# Altium PCB ControlBoard_PCB.PcbDoc (part 2 of 2)
Units mm, origin at the board's own origin, x right, y up, seen from the top; angles counter-clockwise.
Board outline 41.4 x 42 mm, 2 copper layers (Top Layer, Bottom Layer), stack 1.448 mm thick; 86 components, 75 nets, 347 pads, 144 vias.
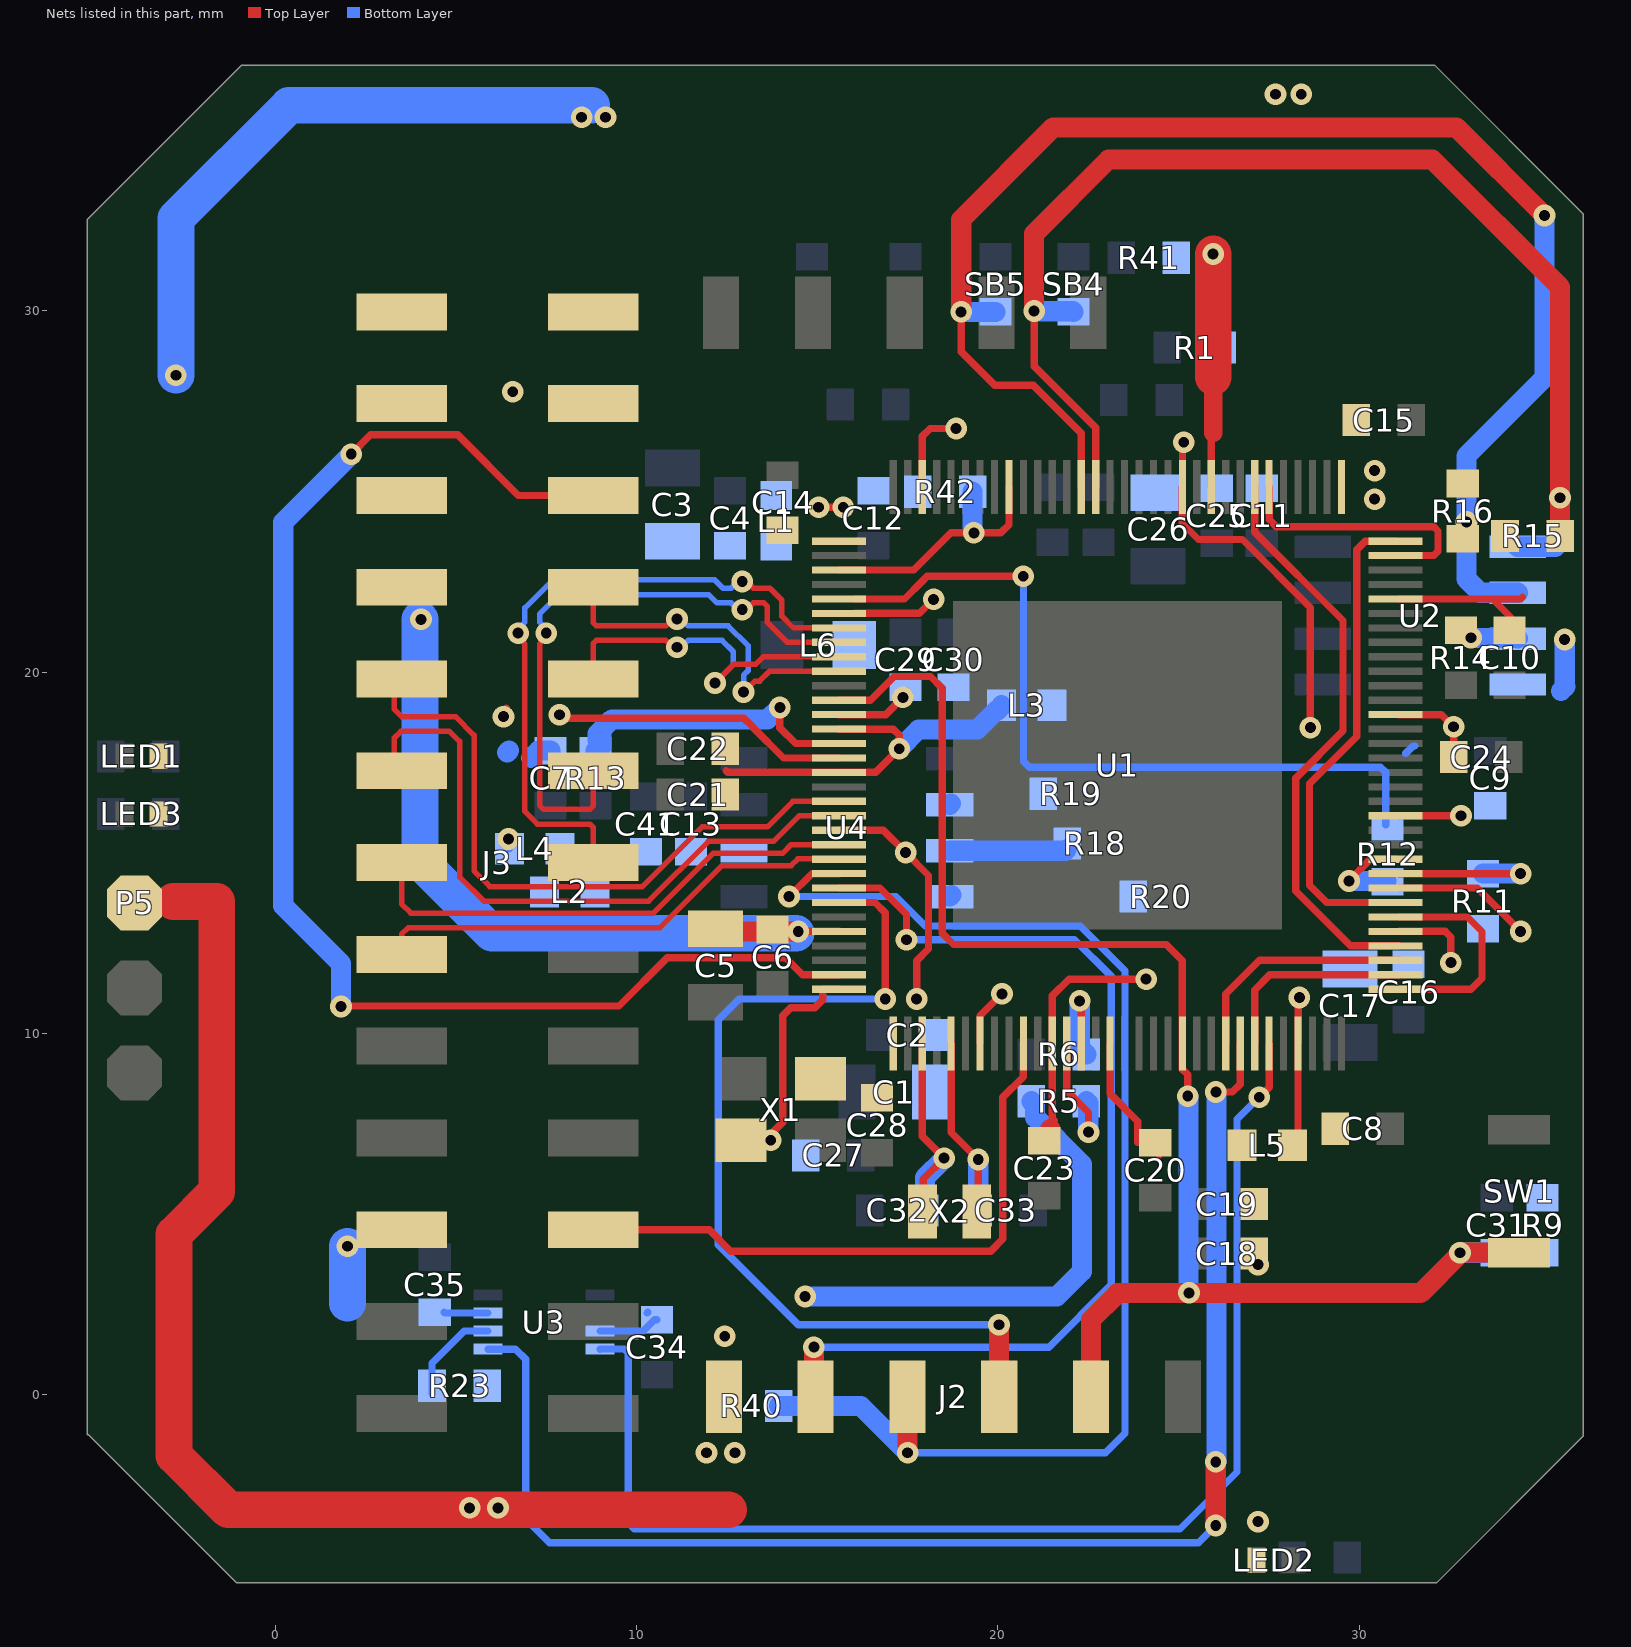
[diagram p2: the nets of this part, all layers, seen from the top]

## Via types
v1: diameter 0.6, hole 0.3, Top Layer to Bottom Layer, tented both sides, 138 vias
v2: diameter 3.2, hole 3.2, Top Layer to Bottom Layer, 4 vias
v3: diameter 0.6, hole 0.3, Top Layer to Bottom Layer, 2 vias

## Nets (pads, with @x,y where several pads share a name; then routed paths per layer and width w, separated by ;. In a path a pad name is that pad's centre, name@x,y a point inside that pad or via, vN(x,y) a via of type N, cw(c..) or ccw(c..) an arc to the next point about the centre after c; other vN are vias at no path point) (continued)
NetR5_2: R5.2 U1.13 | length 3.6
  Top Layer w0.203: U1.13@21.909,9.727 21.909,8.419 22.509,7.818 v1(22.509,7.274)
  Bottom Layer w0.559: R5.2@22.454,8.128 22.501,8.08 22.501,7.282 v1(22.509,7.274)
NetR6_2: R6.2 U1.14 | length 2.9
  Top Layer w0.203: v1@22.266,11.033 22.307,10.992 22.307,9.729 U1.14@22.309,9.727
  Bottom Layer w0.559: v1@22.268,10.904 v1(22.266,10.906) 22.266,9.611 R6.2@22.454,9.423
NetR11_2: R11.2 U1.40 | length 21.9
  Top Layer w0.203: U1.40@31.109,14.027 33.267,14.027 ; v1(34.468,12.827) 33.267,14.027 ; U1.40@31.459,14.027 33.267,14.027 ; U1.40@31.459,14.027 33.267,14.027 ; U1.40@31.459,14.027 33.267,14.027 ; U1.40@31.459,14.027 33.267,14.027 ; U1.40@31.459,14.027 33.267,14.027 ; U1.40@31.459,14.027 33.267,14.027 ; U1.40@31.459,14.027 33.267,14.027 ; U1.40@31.459,14.027 33.267,14.027 ; U1.40@31.459,14.027 33.267,14.027 ; U1.40@31.459,14.027 33.267,14.027
NetR12_2: R12.2 U1.42 | length 2.6
  Top Layer w0.203: v1(29.718,14.224) 29.718,14.238 30.307,14.827 U1.42@31.009,14.827
  Bottom Layer w0.203: R12.2@30.759,14.224 R12.2@30.785,14.199
  Bottom Layer w0.559: v1(29.718,14.224) R12.2@30.759,14.224
NetR13_2: R13.2 U1.111 | length 8.5
  Top Layer w0.203: v1(13.97,19.025) 13.97,18.466 14.408,18.027 U1.111@15.609,18.027
  Bottom Layer w0.559: R13.2@8.865,17.831 8.928,17.831 9.03,17.932 9.03,18.312 ; R13.2@8.928,18.11 8.928,18.301 9.322,18.694 13.629,18.694 13.959,19.025 v1(13.97,19.025)
NetR14_2: R14.2 U2.7 | length 1.3
  Bottom Layer w0.559: v1(33.096,20.955) 33.104,20.947 34.374,20.947 U2.7@34.392,20.93
NetR18_1: R18.1 U4.3 | length 3.2
  Bottom Layer w0.559: U4.3@18.669,15.062 21.869,15.062 R18.1@21.895,15.088
NetR19_1: R19.1 U4.2 | length 0
  Bottom Layer w0.559: U4.2@18.669,16.332 U4.2@18.701,16.364
NetR20_1: R20.1 U4.4 | length 0.1
  Bottom Layer w0.559: U4.4@18.669,13.792 U4.4@18.715,13.838
NetR23_2: R23.2 U3.6 | length 2.8
  Bottom Layer w0.203: R23.2@4.343,0.025 R23.2@4.343,0.254 4.343,0.877 5.235,1.769 U3.6@5.893,1.769
NetU1_39: U1.39 U1.64 | length 13.6
  Top Layer w0.203: U1.39@31.009,13.627 29.101,13.627 28.626,14.102 28.626,16.911 29.935,18.22 29.935,23.392 30.169,23.626 U1.64@31.009,23.627 U1.64@31.009,23.627
NetU1_63: U1.63 U1.70 | length 7.4
  Top Layer w0.203: U1.70@27.509,25.127 27.509,24.224 27.705,24.028 32.063,24.028 32.182,23.909 32.182,23.348 32.063,23.229 U1.63@31.11,23.229
OPTO_IN: J3.6 U1.127 | length 38.9
  Top Layer w0.203: v1(1.824,10.749) 1.84,10.765 9.52,10.765 10.858,12.102 14.125,12.102 14.598,11.629 15.607,11.629 U1.127@15.609,11.627 ; v1(2.108,26.035) 2.642,26.568 5.055,26.568 6.731,24.892 J3.6@8.805,24.892
  Bottom Layer w0.559: v1(1.824,10.749) 1.824,11.943 0.229,13.538 0.229,24.155 v1(2.108,26.035)
PHY_IRQn: R42.2 U1.88 U1.99 | length 7.4
  Top Layer w0.203: U1.99@15.609,22.827 17.678,22.827 18.707,23.856 v1(19.339,23.856) 20.086,23.856 20.309,24.079 U1.88@20.309,25.127
  Bottom Layer w0.559: R42.2@19.304,24.994 19.304,23.903 19.339,23.868 v1(19.339,23.856)
QSPI_CLK: R11.1 U1.41 | length 34.5
  Top Layer w0.203: U1.41@31.109,14.427 v1(34.468,14.427) ; U1.41@31.459,14.427 v1(34.468,14.427) ; U1.41@31.459,14.427 v1(34.468,14.427) ; U1.41@31.459,14.427 v1(34.468,14.427) ; U1.41@31.459,14.427 v1(34.468,14.427) ; U1.41@31.459,14.427 v1(34.468,14.427) ; U1.41@31.459,14.427 v1(34.468,14.427) ; U1.41@31.459,14.427 v1(34.468,14.427) ; U1.41@31.459,14.427 v1(34.468,14.427) ; U1.41@31.459,14.427 v1(34.468,14.427) ; U1.41@31.459,14.427 v1(34.468,14.427)
  Bottom Layer w0.559: R11.1@33.426,14.427 v1(34.468,14.427)
QSPI_CS: R12.1 U1.101 | length 23
  Top Layer w0.203: v1(20.704,22.654) 18.043,22.654 17.924,22.535 17.417,22.027 ; 17.417,22.027 16.059,22.027 17.417,22.027
  Bottom Layer w0.203: v1(20.704,22.654) 20.714,22.644 20.714,17.537 20.877,17.374 30.59,17.374 30.734,17.229 R12.1@30.734,15.773
QSPI_SIO0: U1.33 U1.38 | length 6.2
  Top Layer w0.203: U1.33@31.109,11.227 33.097,11.227 33.401,11.532 33.401,12.827 33.001,13.227 U1.38@31.109,13.227
QSPI_SIO1: U1.26 U1.34 | length 5.7
  Top Layer w0.203: U1.26@27.109,9.727 27.109,11.208 27.528,11.627 U1.34@31.009,11.627 U1.34@31.109,11.627
QSPI_SIO2: U1.24 U1.35 | length 6.6
  Top Layer w0.203: U1.24@26.309,9.727 26.309,11.094 27.242,12.027 U1.35@31.009,12.027 U1.35@31.109,12.027
QSPI_SIO3: U1.36 U1.71 | length 16.9
  Top Layer w0.203: U1.71@27.11,24.417 27.11,25.126 U1.71@27.109,25.127 27.109,23.874 29.554,21.429 29.554,18.378 28.245,17.069 28.245,13.945 29.762,12.427 U1.36@31.009,12.427 U1.36@31.109,12.427
RST: C31.1 J2.5 R9.1 SW1.1 U1.21 U1.108 | length 42
  Top Layer w0.203: U1.108@15.609,19.227 16.478,19.227 17.134,19.883 18.14,19.883 18.466,19.558 18.466,12.776 18.775,12.467 24.666,12.467 25.109,12.024 U1.21@25.109,9.727 25.109,9.018 25.257,8.87 v1(25.257,8.269)
  Top Layer w0.559: J2.5@22.581,-0.051 22.581,2.083 23.317,2.819 v1@25.289,2.819 ; v1(25.294,2.824) v1@25.289,2.819 ; v1@32.804,3.924 31.699,2.819 v1@25.289,2.819 ; v1@32.819,3.94 SW1.1@34.424,3.94
  Bottom Layer w0.559: v1(25.257,8.269) 25.278,8.248 25.278,2.84 v1(25.294,2.824) ; v1(32.791,3.937) C31.1@33.807,3.937
RXA_N: J3.14 U1.103 | length 18.8
  Top Layer w0.152: v1(6.728,21.082) 6.728,20.961 6.914,20.775 6.914,16.147 7.262,15.799 8.716,15.799 8.805,15.71 J3.14@8.805,14.732 ; v1(12.929,22.509) 13.05,22.509 13.235,22.324 13.695,22.324 14.022,21.996 14.022,21.554 14.349,21.227 U1.103@15.609,21.227
  Bottom Layer w0.152: v1(6.728,21.082) 6.728,21.203 6.914,21.389 6.914,21.779 7.69,22.555 12.168,22.555 12.4,22.324 12.622,22.324 12.807,22.509 v1(12.929,22.509)
RXA_P: J3.12 U1.104 | length 17.5
  Top Layer w0.152: v1(7.506,21.082) 7.506,20.961 7.32,20.775 7.32,16.315 7.43,16.205 8.716,16.205 8.805,16.294 J3.12@8.805,17.272 ; v1(12.929,21.731) 13.05,21.731 13.235,21.917 13.526,21.917 13.616,21.828 13.616,21.386 14.174,20.827 U1.104@15.609,20.827
  Bottom Layer w0.152: v1(7.506,21.082) 7.506,21.203 7.32,21.389 7.32,21.611 7.858,22.149 12,22.149 12.232,21.917 12.622,21.917 12.807,21.731 v1(12.929,21.731)
RXB_N: J3.15 U1.119 | length 13.6
  Top Layer w0.152: J3.15@3.505,12.192 3.505,12.751 3.683,12.928 7.274,12.928 ; 7.324,12.927 cw(c7.324,13.663) 7.274,12.928 ; U1.119@15.609,14.827 15.6,14.836 14.469,14.836 14.284,14.651 12.365,14.651 10.641,12.927 7.274,12.928
RXB_P: J3.13 U1.118 | length 14.1
  Top Layer w0.152: J3.13@3.505,14.732 3.505,13.589 3.761,13.333 10.473,13.333 12.126,14.986 14.044,14.986 14.285,15.227 U1.118@15.609,15.227
SCL_: R16.1 SB5.1 U1.83 U2.6 | length 41.1
  Top Layer w0.203: v1@18.987,29.947 18.987,28.867 19.914,27.94 20.98,27.94 22.31,26.61 U1.83@22.31,25.129
  Top Layer w0.559: v1@18.987,29.947 v1(18.987,29.972) 18.987,32.529 21.535,35.077 32.69,35.077 v1(35.128,32.639)
  Bottom Layer w0.559: v1(18.987,29.972) SB5.1@19.939,29.972 ; U2.6@34.392,22.2 33.353,22.2 32.969,22.583 v1(32.969,24.155) 32.969,25.984 35.128,28.143 v1(35.128,32.639)
SDA_: R15.1 SB4.1 U1.82 U2.5 | length 35
  Top Layer w0.203: v1(21.006,29.997) 21.006,28.467 22.709,26.764 U1.82@22.709,25.131
  Top Layer w0.559: v1(21.006,29.997) 21.006,32.131 23.063,34.188 32.025,34.188 35.56,30.654 v1(35.56,24.83) R15.1@35.56,23.774
  Bottom Layer w0.559: v1(21.006,29.997) 21.014,29.99 22.08,29.99 SB4.1@22.098,29.972 ; U2.5@34.392,23.47 35.433,23.47 35.56,23.597 v1(35.56,24.83)
STEP: J3.22 U1.10 | length 17.4
  Top Layer w0.203: J3.22@8.805,4.572 12.014,4.572 12.605,3.981 19.805,3.981 20.142,4.318 20.142,8.235 20.707,8.8 20.707,9.726 U1.10@20.709,9.727
SWDCLK: J2.3 R40.2 U1.120 | length 36.5
  Top Layer w0.203: v1(14.224,13.792) 14.859,14.427 U1.120@15.609,14.427
  Top Layer w0.559: J2.3@17.501,-0.051 17.505,-0.056 v1(17.505,-1.6)
  Bottom Layer w0.203: v1(14.224,13.792) 17.177,13.792 17.99,12.979 22.281,12.979 23.52,11.74 23.52,-1.06 22.98,-1.6 v1(17.505,-1.6)
  Bottom Layer w0.559: R40.2@13.945,-0.305 16.21,-0.305 v1(17.505,-1.6)
SWDIO: J2.2 U1.121 | length 27.8
  Top Layer w0.203: U1.121@15.609,14.027 16.741,14.027 17.475,13.293 v1(17.475,12.598)
  Top Layer w0.559: v1@14.918,1.324 14.918,-0.009 J2.2@14.961,-0.051
  Bottom Layer w0.203: v1(14.91,1.324) 21.417,1.324 23.139,3.047 23.139,11.582 22.123,12.598 v1(17.475,12.598)
SWO: J2.4 U1.122 | length 25.5
  Top Layer w0.203: U1.122@15.609,13.627 16.602,13.627 16.887,13.342 v1(16.887,10.955)
  Top Layer w0.559: v1@20.038,1.94 20.038,-0.048 J2.4@20.041,-0.051
  Bottom Layer w0.203: v1@16.837,10.955 12.846,10.955 12.268,10.377 12.268,4.153 14.479,1.943 v1(20.035,1.943)
TXA_N: J3.10 U1.105 | length 10
  Top Layer w0.152: J3.10@8.805,19.812 8.805,20.79 8.894,20.879 10.818,20.879 11.004,20.693 v1(11.125,20.693) ; v1(12.175,19.702) 12.688,20.215 13.297,20.215 13.513,20.431 15.606,20.431 U1.105@15.609,20.427
  Bottom Layer w0.152: v1(11.125,20.693) 11.246,20.693 11.432,20.879 12.37,20.879 12.683,20.566 12.683,20.21 v1(12.175,19.702)
TXA_P: J3.8 U1.106 | length 9.9
  Top Layer w0.152: J3.8@8.805,22.352 8.805,21.374 8.894,21.285 10.818,21.285 11.004,21.471 v1(11.125,21.471) ; v1(12.965,19.452) 12.977,19.452 13.278,19.753 13.41,19.753 13.684,20.027 U1.106@15.609,20.027
  Bottom Layer w0.152: v1(11.125,21.471) 11.246,21.471 11.432,21.285 12.538,21.285 13.089,20.734 13.089,20.041 12.965,19.918 v1(12.965,19.452)
TXB_N: J3.11 U1.116 | length 18.5
  Top Layer w0.152: J3.11@3.505,17.272 3.302,17.475 3.302,18.186 3.48,18.364 4.826,18.364 5.105,18.085 5.105,14.335 5.777,13.663 10.336,13.663 11.989,15.316 13.792,15.316 14.503,16.027 U1.116@15.609,16.027
TXB_P: J3.9 U1.115 | length 18.5
  Top Layer w0.152: J3.9@3.505,19.812 3.302,19.609 3.302,18.974 3.505,18.771 4.994,18.771 5.512,18.253 5.512,14.503 5.946,14.07 10.167,14.07 11.82,15.723 13.624,15.723 14.329,16.427 U1.115@15.609,16.427 U1.115@15.585,16.404
UART_RX: U1.27 U3.4 | length 35.3
  Top Layer w0.203: v1(27.234,8.24) 27.509,8.516 U1.27@27.509,9.727
  Bottom Layer w0.203: U3.4@8.993,1.269 U3.4@8.993,1.269 9.66,1.27 9.779,1.151 9.779,-3.545 9.943,-3.708 25.044,-3.708 26.619,-2.134 26.619,7.632 27.227,8.24 v1(27.234,8.24)
UART_TX: U1.25 U3.5 | length 39
  Top Layer w0.203: v1(26.035,8.382) 26.492,8.382 26.709,8.599 U1.25@26.709,9.727
  Top Layer w0.559: v1(26.032,-3.612) v1(26.032,-1.851)
  Bottom Layer w0.203: U3.5@5.893,1.269 6.656,1.269 6.934,0.991 6.934,-3.429 7.595,-4.089 25.555,-4.089 v1(26.032,-3.612)
  Bottom Layer w0.559: v1(26.032,-1.851) 26.051,-1.832 26.051,8.366 v1(26.035,8.382)
VCC_3V3: C1.1 C2.1 C8.1 C9.1 C10.1 C11.1 C12.1 C13.1 C14.1 C15.1 C16.1 C17.1 C18.1 C34.1 C41.1 J2.1 J3.2 J3.4 L1.1 L2.1 L4.1 L5.1 LED1.1 LED2.1 LED3.1 P5.1 R1.1 R5.1 R9.2 R15.2 R16.2 R23.1 R40.1 R41.2 R42.1 U1.7 U1.29 U1.37 U1.45 U1.60 U1.65 U1.74 U1.94 U1.97 U1.117 U2.8 U3.3 U4.6 | length 96.7
  Top Layer w0.203: v1(15.042,24.567) v1(15.723,24.567) v1@15.723,24.663 ; U1.117@15.609,15.627 16.834,15.627 v1(17.45,15.011) 18.085,14.376 18.085,12.344 17.755,12.014 v1(17.755,10.955) ; U1.94@17.909,25.127 17.909,26.526 18.129,26.746 v1(18.847,26.746) ; U1.7@19.509,9.727 19.509,10.492 v1(20.117,11.1) ; U1.74@25.909,25.127 25.909,26.569 25.959,26.619 ; v1@27.102,-3.581 v1@27.102,-3.531 ; L5.1@28.157,6.909 28.309,7.06 U1.29@28.309,9.727 28.31,9.729 28.31,10.962 v1(28.346,10.998) v1@28.359,10.986 ; U1.37@31.109,12.827 32.385,12.827 32.537,12.675 v1(32.537,11.963) ; U1.45@31.109,16.027 v1(32.817,16.027) ; U1.60@31.109,22.027 34.473,22.027 34.519,22.073 ; 33.744,21.971 C10.1@34.188,21.526
  Top Layer w0.508: 25.959,26.619 25.959,28.169
  Top Layer w1.016: -2.819,13.652 -1.613,13.652 -1.613,5.626 -2.794,4.445 -2.794,-1.676 -1.295,-3.175 6.172,-3.175 12.548,-3.175 ; 25.959,28.169 v1(25.959,31.572)
  Bottom Layer w0.203: U3.3@8.993,1.769 10.189,1.769 10.503,2.083 C34.1@10.566,2.083 ; C34.1@10.296,2.269 C34.1@10.312,2.285
  Bottom Layer w0.559: R40.1@12.408,-0.47 R40.1@12.446,-0.508 ; v1(14.669,2.725) 21.634,2.725 22.33,3.421 22.33,6.382 21.031,7.681 21.031,8.026 R5.1@20.93,8.128 ; 35.585,19.482 35.712,19.609 ; 35.687,19.609 v1(35.687,20.904)
  Bottom Layer w1.016: v1(-2.743,28.219) -2.743,32.563 0.381,35.687 8.763,35.687
  other v1: 27.203,-3.505 5.385,-3.124 6.172,-3.124 11.938,-1.6 12.725,-1.6 12.446,1.626 27.203,3.607 30.429,24.79 30.429,25.578 8.484,35.357 9.144,35.357 27.686,35.992 28.397,35.992
VDD12: C21.1 C22.1 L3.2 U1.110 U1.113 | length 10.5
  Top Layer w0.203: 12.484,17.272 12.529,17.227 U1.113@15.609,17.227 15.61,17.229 16.619,17.229 v1(17.272,17.882) 17.272,18.263 17.109,18.426 15.61,18.426 U1.110@15.609,18.427
  Bottom Layer w0.559: v1(17.272,17.882) 17.805,18.415 19.431,18.415 19.95,18.934 19.982,18.934 20.103,19.055 L3.2@20.103,19.087
VDD_5V: C35.1 J3.21 U3.7 | length 2.8
  Bottom Layer w0.203: C35.1@4.674,2.285 4.69,2.269 U3.7@5.893,2.269
  Bottom Layer w1.016: 2.007,2.54 v1(2.007,4.115)
VDD_CORE: C29.1 C30.1 L6.2 U1.109 | length 2
  Top Layer w0.203: U1.109@15.609,18.827 16.897,18.827 v1(17.374,19.304)
VDD_CR: C23.1 C24.1 C25.1 C26.1 L3.1 U1.12 U1.52 U1.76 | length 19.6
  Top Layer w0.203: 21.56,7.595 21.509,7.645 U1.12@21.509,9.727 21.509,11.044 21.971,11.506 v1(24.105,11.506) ; v1@25.159,26.352 v1(25.146,26.365) 25.11,26.33 25.11,25.129 U1.76@25.109,25.127 25.109,24.116 25.552,23.673 26.772,23.673 28.651,21.793 v1(28.651,18.466) ; U1.52@31.109,18.827 32.277,18.827 v1(32.614,18.491) C24.1@32.614,17.653
  Top Layer w0.559: C23.1@21.285,7.036 21.349,7.036 21.45,7.137 C23.1@21.45,7.356
  Bottom Layer w0.203: 31.293,17.755 31.496,17.958 31.547,17.958
VDDANA: C19.1 C20.1 L5.2 U1.16 | length 3.8
  Top Layer w0.203: U1.16@23.109,9.727 23.109,8.336 23.876,7.569 23.876,6.985 ; C20.1@24.224,7.222 24.46,6.985 C20.1@24.46,6.629
VDDBIAS: C7.1 L4.2 U1.112 | length 9.3
  Top Layer w0.203: v1(6.325,18.771) 6.325,18.928 v1@6.396,18.999 ; v1@6.477,15.271 v1@6.488,15.26 ; v1(7.874,18.821) 7.971,18.725 12.975,18.725 13.056,18.644 13.07,18.644 13.233,18.48 13.233,18.466 14.072,17.627 U1.112@15.609,17.627
  Bottom Layer w0.203: L4.2@6.488,15.113 L4.2@6.488,15.26
  Bottom Layer w0.559: 6.426,17.78 6.477,17.831 ; 7.087,17.628 7.29,17.831 C7.1@7.62,17.831
  other v1: 6.463,15.387
VDDTXRX1: C3.1 C4.1 J3.1 J3.3 L1.2 U1.102 | length 2.3
  Top Layer w0.203: U1.102@16.059,21.627 17.836,21.627 v1(18.226,22.017)
  other v1: 6.579,27.762
VDDTXRX2: C5.1 C6.1 J3.5 J3.7 L2.2 U1.124 | length 21.5
  Top Layer w0.203: v1(14.478,12.827) U1.124@15.609,12.827
  Top Layer w0.559: C5.1@12.04,12.903 12.115,12.827 v1(14.478,12.827)
  Bottom Layer w1.016: v1@4.013,21.463 4.013,14.768 6.005,12.776 v1@14.427,12.776
  other v1: 4.039,21.463
XIN32: C32.2 U1.3 X2.1 | length 6.8
  Top Layer w0.203: U1.3@17.909,9.727 17.909,7.162 v1(18.517,6.554) 17.94,5.977 17.94,5.101 X2.1@17.919,5.08
  Bottom Layer w0.559: C32.2@17.983,5.105 17.983,6.01 18.517,6.543 v1(18.517,6.554)
XOUT32: C33.2 U1.5 X2.2 | length 6.3
  Top Layer w0.203: U1.5@18.709,9.727 18.709,7.264 v1(19.459,6.514) X2.2@19.459,5.08
  Bottom Layer w0.559: C33.2@19.456,5.131 19.458,5.132 19.458,6.513 v1(19.459,6.514)
XTAL_IN: C27.2 U1.128 X1.1 | length 6.4
  Top Layer w0.203: X1.1@12.895,7.049 v1(13.716,7.049) 13.716,7.214 14.046,7.544 14.046,10.49 14.275,10.719 14.935,10.719 15.156,10.94 15.156,11.226 15.158,11.227 U1.128@15.609,11.227
XTAL_OUT: C28.2 U1.1 X1.3
pads on no net: U1.8 U1.9 U1.18 U1.19 U1.20 U1.22 U1.23 U1.28 U1.30 U1.31 U1.32 U1.48 U1.49 U1.50 U1.51 U1.53 U1.54 U1.55 U1.56 U1.57 U1.58 U1.59 U1.61 U1.62 U1.66 U1.67 U1.69 U1.72 U1.73 U1.75 U1.77 U1.78 U1.79 U1.80 U1.84 U1.85 U1.86 U1.87 U1.91 U1.92 U1.93 U1.96 U1.100 U1.107 U1.123 U1.125 U1.126 U4.1 U4.5 U4.8

## Polygon pours and split planes (outlines as drawn)
GND on Top Layer "Polygon_1" (hatched 45Degree grid 0.635 track 0.381, remove dead copper, pour order 2): -0.851,34.15 -0.942,34.364 32.134,34.364 33.782,32.715 33.782,-1.143 32.156,-2.769 -1.092,-2.769 -2.807,-1.054 -2.807,32.563 -2.743,32.563 -0.942,34.364
GND on Bottom Layer "Polygon_2" (hatched 45Degree grid 0.635 track 0.381, remove dead copper, pour order 1): -0.851,34.15 -0.942,34.364 32.134,34.364 33.782,32.715 33.782,-1.143 32.156,-2.769 -1.092,-2.769 -2.807,-1.054 -2.807,32.563 -2.743,32.563 -0.942,34.364

## Other copper
Top Layer:
  rectangle net VDDBIAS: 6.045,15.037 6.655,19.482
  rectangle net NetP1_1: -4.648,10.262 -2.807,12.09
  rectangle net VCC_3V3: 11.501,2.1 15.164,3.1
  rectangle net VCC_3V3: -3.48,16.688 -2.083,32.639
  rectangle net GND: -1.651,30.937 7.188,32.639
  rectangle net GND: -1.651,20.828 1.626,32.004
  rectangle net VDDTXRX1: 2.261,26.848 7.163,30.556
  rectangle net #UART_RX: 6.57,-2.21 10.888,0.711
  rectangle net #UART_TX: 6.57,0.94 10.888,3.15
  rectangle net VDD_5V: 1.27,3.48 5.588,5.791
  rectangle net DIAG: 1.27,6.02 5.588,8.331
  rectangle net LINK1: 1.27,8.56 5.588,10.211
  rectangle net XTAL_IN: 14.757,10.617 16.358,11.303
  rectangle net VDDTXRX2: 2.21,20.93 5.029,25.4
  rectangle net VCC_3V3: 7.417,26.873 11.252,35.738
  rectangle net GND: 14.402,6.325 17.12,7.645
  rectangle net VCC_3V3: -3.48,13.132 -1.118,18.136
  rectangle net VCC_3V3: -5.055,12.624 -1.118,14.681
  rectangle net GND: -1.6,-1.778 5.588,3.251
  rectangle net VCC_3V3: 34.188,20.498 35.992,22.758
  rectangle net NetR14_2: 32.334,20.549 33.376,21.59
  rectangle net GND: 32.258,19.152 35.89,20.066
  rectangle net VCC_3V3: 33.604,21.869 34.773,25.019
  rectangle net GND: 33.706,16.053 35.89,19.888
  rectangle net GND: 35.001,7.137 35.865,17.069
  rectangle net VDD12: 12.014,16.18 12.954,18.364
  rectangle net VCC_3V3: 32.41,24.638 34.773,28.169
  rectangle net VCC_3V3: 29.896,27.813 34.773,29.007
  rectangle net GND: 33.706,16.053 34.849,19.304
  rectangle net GND: 13.437,10.947 14.021,11.811
  rectangle net XTAL_IN: 12.192,6.401 14.148,7.645
  rectangle net GND: 12.141,8.077 13.691,9.093
  rectangle net GND: 10.973,8.052 13.767,11.811
  rectangle net VCC_3V3: 11.506,-3.683 13.132,2.642
  rectangle net NetLED1_2: -5.055,17.043 -3.81,18.898
  rectangle net NetLED3_2: -5.055,14.859 -3.81,16.713
  rectangle net VCC_3V3: 26.67,-5.029 27.559,-3.15
  rectangle net GND: 31.064,24.308 32.233,27.559
  rectangle net GND: 12.802,25.044 13.995,28.042
  rectangle net GND: 11.659,27.838 13.995,31.496
  rectangle net GND: 12.802,25.044 16.764,28.6
  rectangle net VCC_3V3: 10.414,23.52 12.573,27.432
  rectangle net GND: 23.647,-1.372 32.893,2.286
  rectangle net GND: 10.49,16.129 11.532,18.339
  rectangle net GND: 30.429,4.978 35.865,7.823
  rectangle net VDDANA: 26.416,4.724 27.534,6.553
  rectangle net VCC_3V3: 27.711,3.277 30.023,7.823
  rectangle net VDD_CR: 20.803,6.528 21.844,7.747
  rectangle net VCC_3V3: 11.125,23.52 16.358,24.867
  rectangle net VCC_3V3: 29.439,24.308 30.886,29.007
  rectangle net VCC_3V3: 33.604,20.498 34.773,22.555
  rectangle net SCL_: 32.461,23.038 33.376,24.435
  rectangle net GND: 20.828,3.302 26.01,6.02
  rectangle net VCC_3V3: 26.238,3.277 28.092,4.445
  rectangle net VDDANA: 23.774,6.325 27.534,7.671
  rectangle net XTAL_OUT: 14.402,7.849 17.196,10.439
Bottom Layer:
  rectangle net VDDTXRX1: 15.062,22.073 15.773,23.927
  rectangle net VDD_CORE: 15.418,18.898 19.202,20.371
  rectangle net GND: 20.93,23.216 23.19,24.054
  rectangle net NetR2_2: 22.708,26.975 23.8,28.169
  rectangle net VDDTXRX1: 15.062,21.692 18.542,22.377
  rectangle net NetR6_2: 21.692,8.89 22.835,10.047
  rectangle net GND: -3.581,15.748 -2.565,16.561
  rectangle net NetR13_2: 8.357,17.348 9.5,19.025
  rectangle net VDDBIAS: 6.045,17.348 8.153,19.329
  rectangle net GND: 6.299,30.48 13.31,31.75
  rectangle net VDDTXRX1: 7.772,22.987 15.773,23.927
  rectangle net GND: 29.713,-2.057 33.172,2.083
  rectangle net RST: 32.461,3.251 35.662,4.369
  rectangle net GND: 29.362,27.813 32.741,33.604
  rectangle net NetR19_1: 17.983,16.256 21.666,17.094
  rectangle net VDD_CR: 20.993,18.11 26.899,20.117
  rectangle net VDDTXRX2: 6.502,12.751 7.849,14.351
  rectangle net GND: 4.826,15.9 13.792,17.094
  rectangle net LINK0: 16.789,26.162 17.78,27.864
  rectangle net VCC_3V3: 17.374,7.518 18.186,11.227
  rectangle net GND: 31.496,18.999 33.223,20.32
  rectangle net VCC_3V3: 8.077,34.874 29.083,36.474
  rectangle net GND: 16.967,20.574 20.345,21.488
  rectangle net VDD_CORE: 15.416,19.66 16.713,21.438
  rectangle net NetL6_1: 13.405,20.066 15.189,21.463
  rectangle net VCC_3V3: 5.004,-5.055 27.305,-4.394
  rectangle net VDD_CR: 23.8,10.211 27.33,12.878
  rectangle net VDD_CR: 23.8,12.497 32.131,13.145
  rectangle net VDD_CR: 31.429,12.788 32.131,17.704
  rectangle net NetR20_1: 18.009,13.437 24.13,14.148
  rectangle net VCC_3V3: 27.711,31.572 29.083,36.271
  rectangle net VCC_3V3: 18.212,26.035 20.345,27.711
  rectangle net VDD_CR: 20.993,17.653 32.995,18.821
  rectangle net GND: 33.172,16.993 34.798,18.212
  rectangle net VCC_3V3: 32.36,15.189 35.382,16.815
  rectangle net NetR19_1: 17.983,15.977 21.666,16.713
  rectangle net NetR18_1: 17.983,14.707 22.327,15.723
  rectangle net GND: 21.184,20.879 32.487,24.054
  rectangle net VCC_3V3: 8.433,13.462 11.913,15.291
  rectangle net GND: 12.725,8.026 15.926,10.439
  rectangle net GND: 16.993,3.302 20.955,4.47
  rectangle net GND: 15.57,3.302 17.196,10.439
  rectangle net GND: 20.523,3.302 21.565,6.071
  rectangle net GND: 28.473,-1.372 32.156,9.677
  rectangle net VCC_3V3: 17.983,25.349 18.72,27.711
  rectangle net VCC_3V3: 19.126,9.779 20.371,11.379
  rectangle net XTAL_IN: 13.31,6.147 15.164,7.595
  rectangle net VCC_3V3: 5.004,-5.004 6.553,0.838
  rectangle net VCC_3V3: 11.506,-1.93 13.056,1.956
  rectangle net GND: 10.82,-3.429 24.867,-2.134
  rectangle net GND: 10.058,-3.429 11.201,1.168
  rectangle net GND: 7.391,3.353 10.693,3.835
  rectangle net GND: 3.581,3.378 10.693,5.944
  rectangle net VDD_5V: 1.499,1.88 4.867,3.2
  rectangle net LINK0: 13.487,28.854 15.386,30.353
  rectangle net NetLED3_2: -5.055,14.776 -3.835,16.706
  rectangle net NetLED1_2: -5.055,17.043 -3.835,18.974
  rectangle net VCC_3V3: 27.534,10.211 28.753,11.633
  rectangle net VCC_3V3: 34.493,4.674 35.382,12.167
  rectangle net VCC_3V3: 27.534,11.252 35.687,12.319
  rectangle net VCC_3V3: 35.052,4.674 35.992,19.152
  rectangle net VCC_3V3: 26.899,-5.055 27.559,4.42
  rectangle net GND: 31.064,22.454 32.487,33.604
  rectangle net GND: 15.189,26.899 16.332,28.499
  rectangle net VDDTXRX1: 6.248,22.987 9.474,28.194
  rectangle net GND: 9.881,24.638 13.106,29.388
  rectangle net VCC_3V3: 19.634,7.544 21.309,8.687
  rectangle net VCC_3V3: 17.602,7.544 20.371,10.744
  rectangle net VCC_3V3: 7.137,14.58 17.78,15.494
  rectangle net GND: 27.94,18.999 32.487,21.717
  rectangle net VCC_3V3: 33.528,18.821 35.992,19.964
  rectangle net GND: 28.956,4.674 34.315,11.074
  rectangle net VCC_3V3: 10.058,1.473 13.056,2.7
  rectangle net GND: 9.728,16.916 12.09,18.136
  rectangle net LINK1: 17.399,28.118 20.396,29.312
  rectangle net LINK1: 16.866,28.118 18.009,30.353
  rectangle net VCC_3V3: 26.873,24.359 29.083,29.896
  rectangle net VCC_3V3: 24.384,30.988 28.829,32.893
  rectangle net VCC_3V3: 25.654,28.473 29.083,32.817
  region net NetR1_2: 25.476,27.051 25.476,29.591 24.13,29.591 24.13,27.051
  rectangle net VDD_CR: 23.622,24.359 26.543,26.645
  rectangle net VCC_3V3: 26.873,24.359 30.886,25.984
  rectangle net NetR2_2: 22.25,24.359 23.419,28.169
  rectangle net NetJ1_1: 21.514,30.937 23.978,32.893
  rectangle net NetJ1_2: 19.355,31.115 20.498,32.893
  rectangle net NetJ1_3: 16.866,31.115 18.009,32.893
  rectangle net NetJ1_4: 14.275,31.115 15.418,32.893
  rectangle net VCC_3V3: 13.31,24.257 18.72,25.883
  rectangle net NetR11_2: 32.969,12.497 34.849,13.462

## Silkscreen, mask and mechanical layers (free items; w line width, h text height)
Top Overlay:
  lines w0.127: 28.804,6.579 30.607,6.579 31.013,6.172 ; 29.614,6.579 29.693,6.579
  text "JTAG" at 23.876,34.874 h1.4
  text "INTERFACING HEADER" at 1.727,31.369 h1.4
  text "#" at 14.427,27.178 h1.52 r180
  text "#" at 28.448,26.518 h1.52
  text "# >> 0.1uF" at -3.505,23.266 h2.03 r90
  text "#" at 35.687,20.269 h1.52 r180
  text "#" at 12.852,19.66 h1.52 r180
  text "#" at 34.9,17.12 h1.52
  text "#" at 12.852,15.824 h1.52 r180
  text "VCC_3V3" at -2.896,12.776 h1.27
  text "NetP1_1" at -2.896,10.427 h1.27
  text "#" at 13.31,9.652 h1.52
  text "GND" at -2.896,8.077 h1.27
  text "#" at 32.309,7.874 h1.52 r180
  text "#" at 20.93,3.81 h1.52
  text "#" at 24.003,3.759 h1.52
  text "SW HEADER" at -0.254,-4.851 h1.4
Bottom Overlay:
  text "#" at 12.192,26.772 h1.52 r180
  text "#" at 25.959,22.835 h1.52 r180
  text "#" at 27,22.835 h1.52 r180
  text "#" at 16.205,22.784 h1.52 r180
  text "#" at 20.295,20.295 h1.52
  text "#" at 11.151,18.339 h1.52 r180
  text "#" at 6.833,15.926 h1.52
  text "#" at 35.179,15.926 h1.52
  text "#" at 10.49,13.335 h1.52
  text "#" at 15.265,10.516 h1.52 r180
  text "#" at 31.699,8.611 h1.52
  text "#" at 33.452,3.226 h1.52 r180
  text "#" at 12.04,2.464 h1.52 r180
  text "# >> 0.1uF" at 15.621,-4.826 h2.03
Mechanical 2:
  lines w0.254: -5.2,-1.062 -5.2,32.519 ; -5.2,-1.062 -5.161,-1.101 -1.062,-5.2 ; -5.2,-1.062 -5.2,32.519 ; -5.2,32.519 -0.919,36.8 ; -1.062,-5.2 32.138,-5.2 ; -1.062,-5.2 32.138,-5.2 ; -0.919,36.8 32.083,36.8 ; -0.919,36.8 32.083,36.8 ; 32.083,36.8 36.2,32.683 ; 32.138,-5.2 36.2,-1.138 ; 36.2,-1.138 36.2,32.683 ; 36.2,-1.138 36.2,32.683

## Dimensions
-0.919,36.8 to -1.062,-5.2 on Mechanical 1
36.2,32.683 to -5.2,32.519 on Mechanical 1